# Altium PCB PCB1.PcbDoc
Units mil, origin at the board's own origin, x right, y up, seen from the top; angles counter-clockwise.
Board outline 6000 x 4000 mil, 2 copper layers (Top Layer, Bottom Layer); 17 components, 12 nets, 47 pads, 0 vias.
Unrouted connection lines stored in the file: 4.
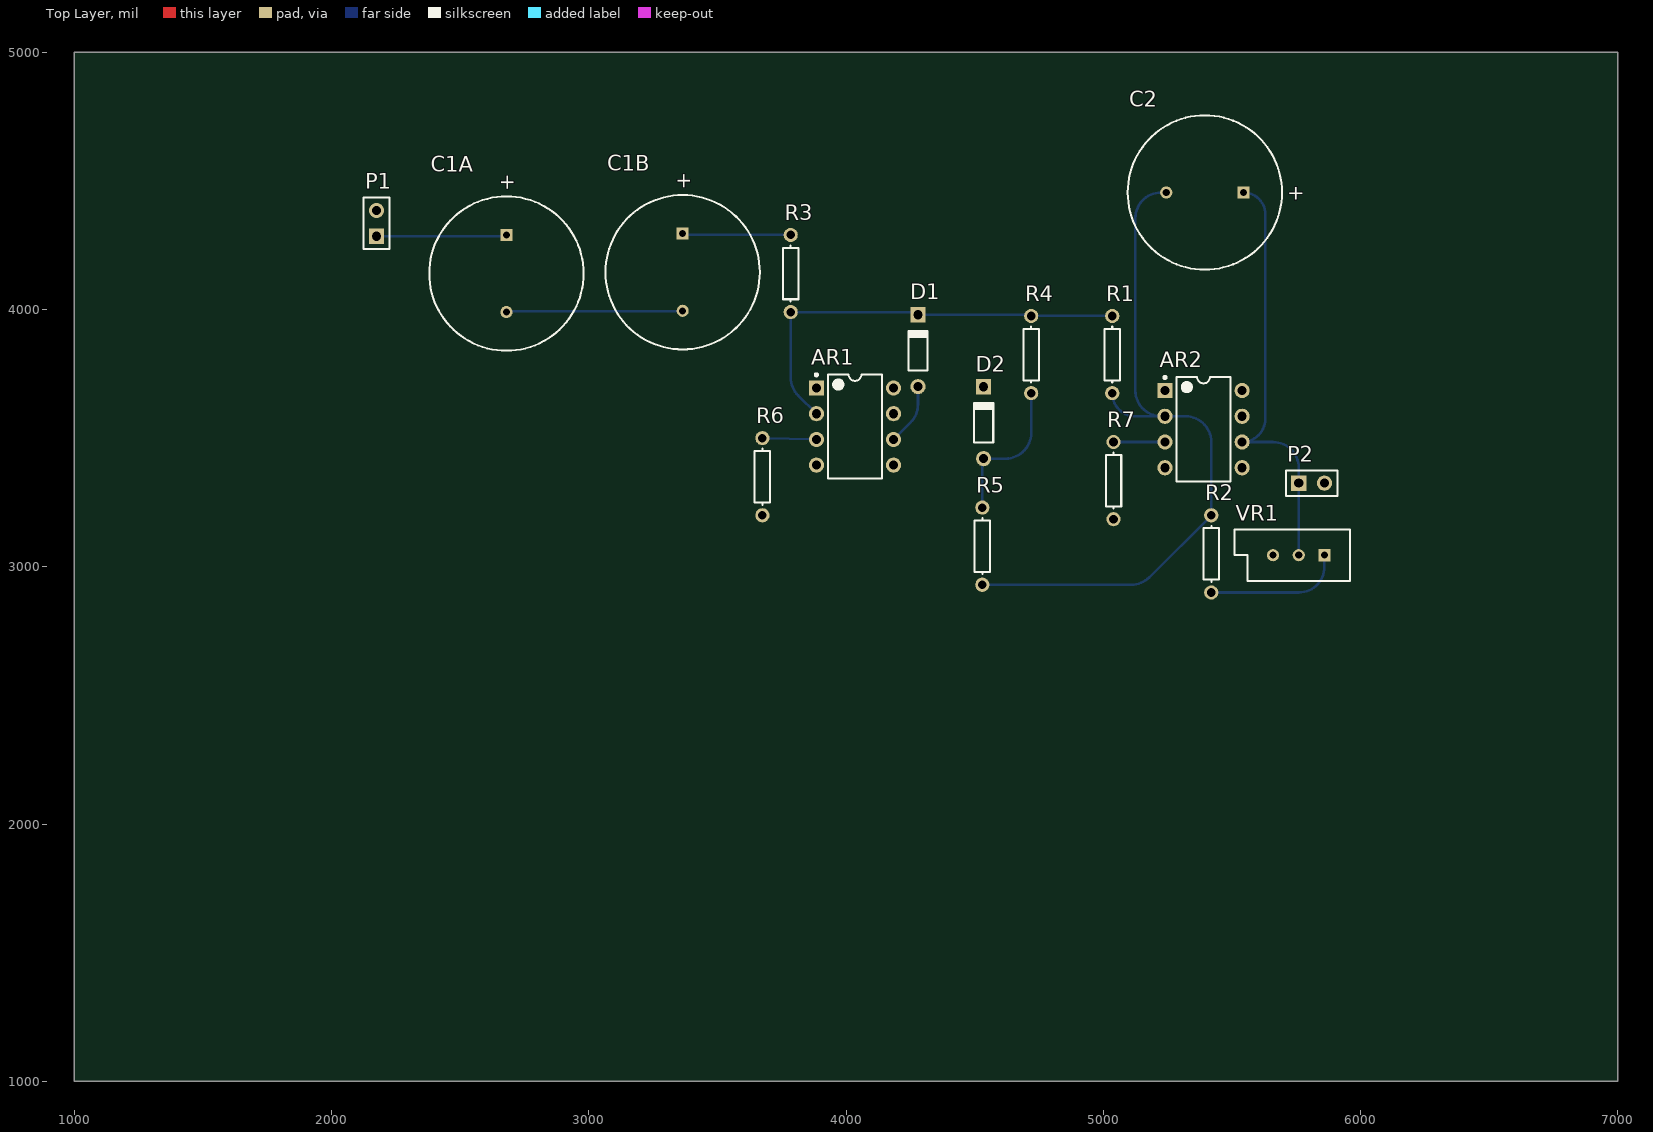
[diagram p0: Top Layer view]
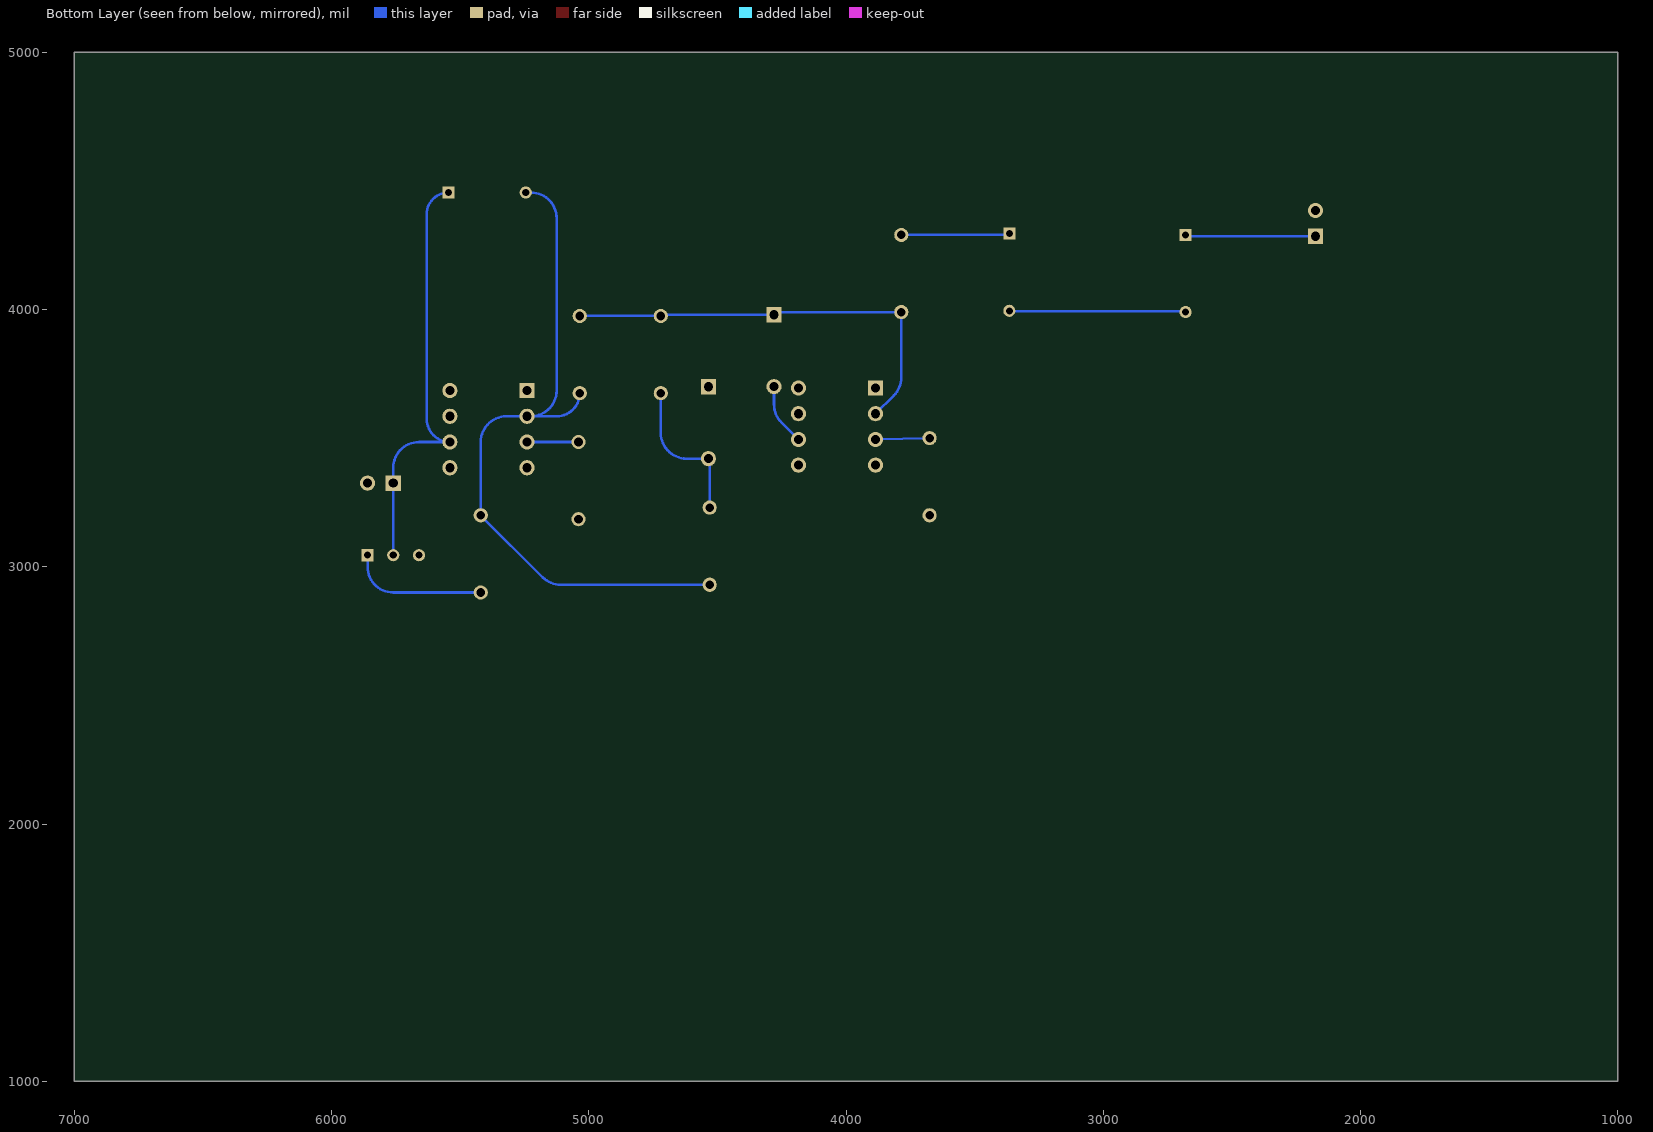
[diagram p1: Bottom Layer view, seen from below]

## Layer stack, top to bottom
Top Solder: solder mask 0.4, Solder Resist, Dk 3.5
Top Layer: signal copper 1.4
Dielectric 1: dielectric 12.6, FR-4, Dk 4.8
Bottom Layer: signal copper 1.4
Bottom Solder: solder mask 0.4, Solder Resist, Dk 3.5

## Board outline
1000,1000 7000,1000 7000,5000 1000,5000

## Design rules (kind name [scope] priority, off if disabled: settings)
Clearance [All] p1: gap=10 ignorepadtopadclearanceinfootprint=FALSE
PolygonConnect [All] p1: connectstyle=Relief reliefconductorwidth=10 reliefentries=4 polygonreliefangle="90 Angle" airgapwidth=10
RoutingVias [All] p1: holewidth=28 width=50 viastyle="Through Hole" minholewidth=28 minwidth=50 maxholewidth=28 maxwidth=50
SolderMaskExpansion [All] p1: expansion=0 istentingtop=FALSE
SupplyNets "Schematic Supply Nets" [InNet('GND')] p1: voltage=0.000
Width [All] p1: maxlimit=10 minlimit=10 preferedwidth=10
30 further rules are at their usual default settings.

## Components (designator, comment, footprint, x,y, rotation, side; value= is the part's Value field where it differs from the comment)
AR1 "LM107" DIP-8 4035,3545 r0 top
AR2 "LM107" DIP-8 5390,3535 r0 top
C1A "Cap Pol1" RB7.6-15 2680,4140 r90 top value=4.7µF
C1B "Cap Pol1" RB7.6-15 3365,4145 r90 top value=4.7µF
C2 "Cap Pol1" RB7.6-15 5395,4455 r0 top value=4.7µF
D1 "1N4148" DO-35 4280,3840 r90 top
D2 "1N4148" DO-35 4535,3560 r90 top
P1 "AC IN" HDR1X2 2175,4285 r90 top
P2 "DC OUT" HDR1X2 5760,3325 r0 top
R1 "1%" AXIAL-0.3 5035,3825 r270 top value=20K
R2 "1%" AXIAL-0.3 5420,3050 r270 top value=20K
R3 "1%" AXIAL-0.3 3785,4140 r270 top value=20K
R4 "1%" AXIAL-0.3 4720,3825 r270 top value=20K
R5 "1%" AXIAL-0.3 4530,3080 r270 top value=10K
R6 "" AXIAL-0.3 3675,3350 r90 top value=10K
R7 "" AXIAL-0.3 5040,3335 r90 top value=5.1K
VR1 "CAL" VR5 5760,3045 r180 top

## Footprints (in the part's own frame and the unit in brackets; to place one, negate y for a bottom-side part, rotate by r counter-clockwise, add the part's x,y. Pads: shape width x height; smd on the part's side, far side on the other; paste and mask are expansions set on the pad)
AXIAL-0.3 [mm] "Axial Device, Thru-Hole; 2 Leads; 0.3 in Pin Spacing"
  round 1.4 hole 0.85: 1(-3.81,0) 2(3.81,0)
  silkscreen extent -2.77,-0.76 2.77,0.76
DIP-8 [mm] "DIP; 8 Leads; Row Spacing 7.62 mm; Pitch 2.54 mm"
  rect 1.5x1.5 hole 0.9: 1(-3.81,3.81)
  round 1.5 hole 0.9: 2(-3.81,1.27) 3(-3.81,-1.27) 4(-3.81,-3.81) 5(3.81,-3.81) 6(3.81,-1.27) 7(3.81,1.27) 8(3.81,3.81)
  silkscreen extent -3.93,-5.15 2.65,5.23, body extent -3.6,-5.15 3.6,5.15, height 5.08
DO-35 [mm] "Diode, Axial; Body 3.8 x 1.9 mm (LxDia. max), Lead Dia. 0.53 mm (max)"
  round 1.5 hole 0.9: 1(-3.55,0)
  rect 1.5x1.5 hole 0.9: 2(3.55,0)
  silkscreen extent -1.95,-0.95 2.05,0.95
HDR1X2 [mm] "Connector; Header; 2 Position"
  rect 1.5x1.5 hole 0.9: 1(0,0)
  round 1.5 hole 0.9: 2(2.54,0)
  silkscreen extent -1.27,-1.27 3.81,1.27
RB7.6-15 [mm] "Polarized Capacitor (Radial); 2 Leads"
  rect 1.2x1.2 hole 0.7: 1(3.81,0)
  round 1.2 hole 0.7: 2(-3.81,0)
  silkscreen extent -7.62,-7.62 7.62,7.62
VR5 [mm] "Thru-Hole; 3 Leads"
  rect 1.2x1.2 hole 0.7: 1(-2.54,0)
  round 1.2 hole 0.7: 2(0,0) 3(2.54,0)
  silkscreen extent -5.08,-2.54 6.35,2.54

## Part data
AR1 AR2: library part "Op Amp", "FET Operational Amplifier", ComponentLink1Description="Manufacturer Link", ComponentLink1URL=http://www.analog.com/, DatasheetVersion="REV. B", LatestRevisionDate=17-Jul-2002, LatestRevisionNote="Re-released for DXP Platform.", PackageDescription="Can; 8 Leads; Pin Circle Dia. 5.08 mm; Lead Dia. 0.53 mm (max)", PackageReference=H-08A, PackageVersion=1990, Published=8-Jun-2000, Publisher="Altium Limited"
C1A C1B C2: "Polarized Capacitor (Radial)", LatestRevisionDate=17-Jul-2002, LatestRevisionNote="Re-released for DXP Platform.", PackageDescription="Polarized Capacitor (Radial); 2 Leads", PackageReference=RB7.6-15, Published=8-Jun-2000, Publisher="Altium Limited"
D1 D2: library part "Diode 1N4148", "High Conductance Fast Diode", Code_JEDEC=DO-204-AH, ComponentLink1Description="Manufacturer Link", ComponentLink1URL=http://www.fairchildsemi.com/, ComponentLink2Description=Datasheet, ComponentLink2URL=http://www.fairchildsemi.com/ds/1N%2F1N4148.pdf, DatasheetVersion=1997, LatestRevisionDate=17-Jul-2002, LatestRevisionNote="Re-released for DXP Platform.", PackageDescription="Diode, Axial; Body 3.8 x 1.9 mm (LxDia. max), Lead Dia. 0.53 mm (max)", PackageReference=DO-35, Published=8-Jun-2000, Publisher="Altium Limited"
P1 P2: library part "Header 2", "Header, 2-Pin", LatestRevisionDate=17-Jul-2002, LatestRevisionNote="Re-released for DXP Platform.", Publisher="Altium Limited"
R1 R2 R3 R4 R5 R6 R7: library part Res1, "Resistor", LatestRevisionDate=17-Jul-2002, LatestRevisionNote="Re-released for DXP Platform.", PackageDescription="Axial Device, Thru-Hole; 2 Leads; 0.3 in Pin Spacing", PackageReference=AXIAL-0.3, Published=8-Jun-2000, Publisher="Altium Limited"
VR1: library part "Res Varistor", "Varistor (Voltage-Sensitive Resistor)", Code_IPC=RESC2012, LatestRevisionDate=29-May-2009, LatestRevisionNote="IPC-7351 Footprint Added.", PackageDescription="Chip Resistor 0805 Case Size", PackageReference=6-0805, PackageVersion=Mar-2003, Published=24-Mar-1999, Publisher="Altium Limited"

## Nets (pads, with @x,y where several pads share a name; then routed paths per layer and width w, separated by ;. In a path a pad name is that pad's centre, name@x,y a point inside that pad or via, vN(x,y) a via of type N, cw(c..) or ccw(c..) an arc to the next point about the centre after c; other vN are vias at no path point)
GND: P1.2 P2.2 R6.1 R7.1
NetAR1_2: AR1.2 D1.2 R1.1 R3.2 R4.1 | length 1697.1
  Bottom Layer w10: AR1.2 3814.29,3665.71 cw(c3885,3736.42) 3785,3736.42 R3.2 4280,3990 D1.2 4720,3979.76 R4.1 R1.1
NetAR1_3: AR1.3 R6.2 | length 210.1
  Bottom Layer w10: R6.2 AR1.3
NetAR1_6: AR1.6 D1.1 D2.2 | length 240.3
  Bottom Layer w10: AR1.6 4250.71,3560.71 ccw(c4180,3631.42) 4280,3631.42 D1.1
NetAR2_2: AR2.2 C2.2 R1.2 R2.1 R5.2 | length 2765.1
  Bottom Layer w10: R5.2 5108.58,2930 ccw(c5108.58,3030) 5179.29,2959.29 R2.1 5420,3485 ccw(c5320,3485) 5320,3585 AR2.2 ; R1.2 ccw(c5125,3675) 5125,3585 5225,3585 cw(c5225,3685) 5125,3685 5125,4355 cw(c5225,4355) 5225,4455 C2.2
NetAR2_3: AR2.3 R7.2 | length 200
  Bottom Layer w10: R7.2 AR2.3
NetAR2_6: AR2.6 C2.1 P2.1 VR1.2 | length 1687
  Bottom Layer w10: C2.1 cw(c5545,4370) 5630,4370 5630,3575 cw(c5540,3575) AR2.6 5660,3485 cw(c5660,3385) 5760,3385 P2.1 VR1.2
NetC1A_1: C1A.1 P1.1 | length 507.1
  Bottom Layer w10: P1.1 2675,4285 C1A.1
NetC1A_2: C1A.2 C1B.2 | length 687.1
  Bottom Layer w10: C1A.2 2682.5,3992.5 3362.5,3992.5 C1B.2
NetC1B_1: C1B.1 R3.1 | length 422.1
  Bottom Layer w10: C1B.1 3370,4290 R3.1
NetD2_1: D2.1 R4.2 R5.1 | length 589.9
  Bottom Layer w10: R5.1 4530,3415.24 cw(c4535,3415.24) D2.1 4620,3420.24 ccw(c4620,3520.24) 4720,3520.24 R4.2
NetR2_2: R2.2 VR1.1 | length 542.1
  Bottom Layer w10: R2.2 5760,2900 ccw(c5760,3000) 5860,3000 VR1.1
pads on no net: AR1.1 AR1.4 AR1.5 AR1.7 AR1.8 AR2.1 AR2.4 AR2.5 AR2.7 AR2.8 VR1.3

## Text inside footprints (layer, text, board x,y; h text height)
C1A: Top Overlay "+" at 2709.01,4460.15 h59.06 r90
C1B: Top Overlay "+" at 3394.01,4465.15 h59.06 r90
C2: Top Overlay "+" at 5715.15,4425.99 h59.06